# Altium PCB Vibration_Datalogger.PcbDoc (part 6 of 7)
Units mm, origin at the board's own origin, x right, y up, seen from the top; angles counter-clockwise.
Board outline 75.58 x 57.4 mm, 4 copper layers (Top Layer, Int1 (GND), Int2 (PWR), Bottom Layer), stack 1.44 mm thick; 126 components, 59 nets, 413 pads, 160 vias.
Unrouted connection lines stored in the file: 53.
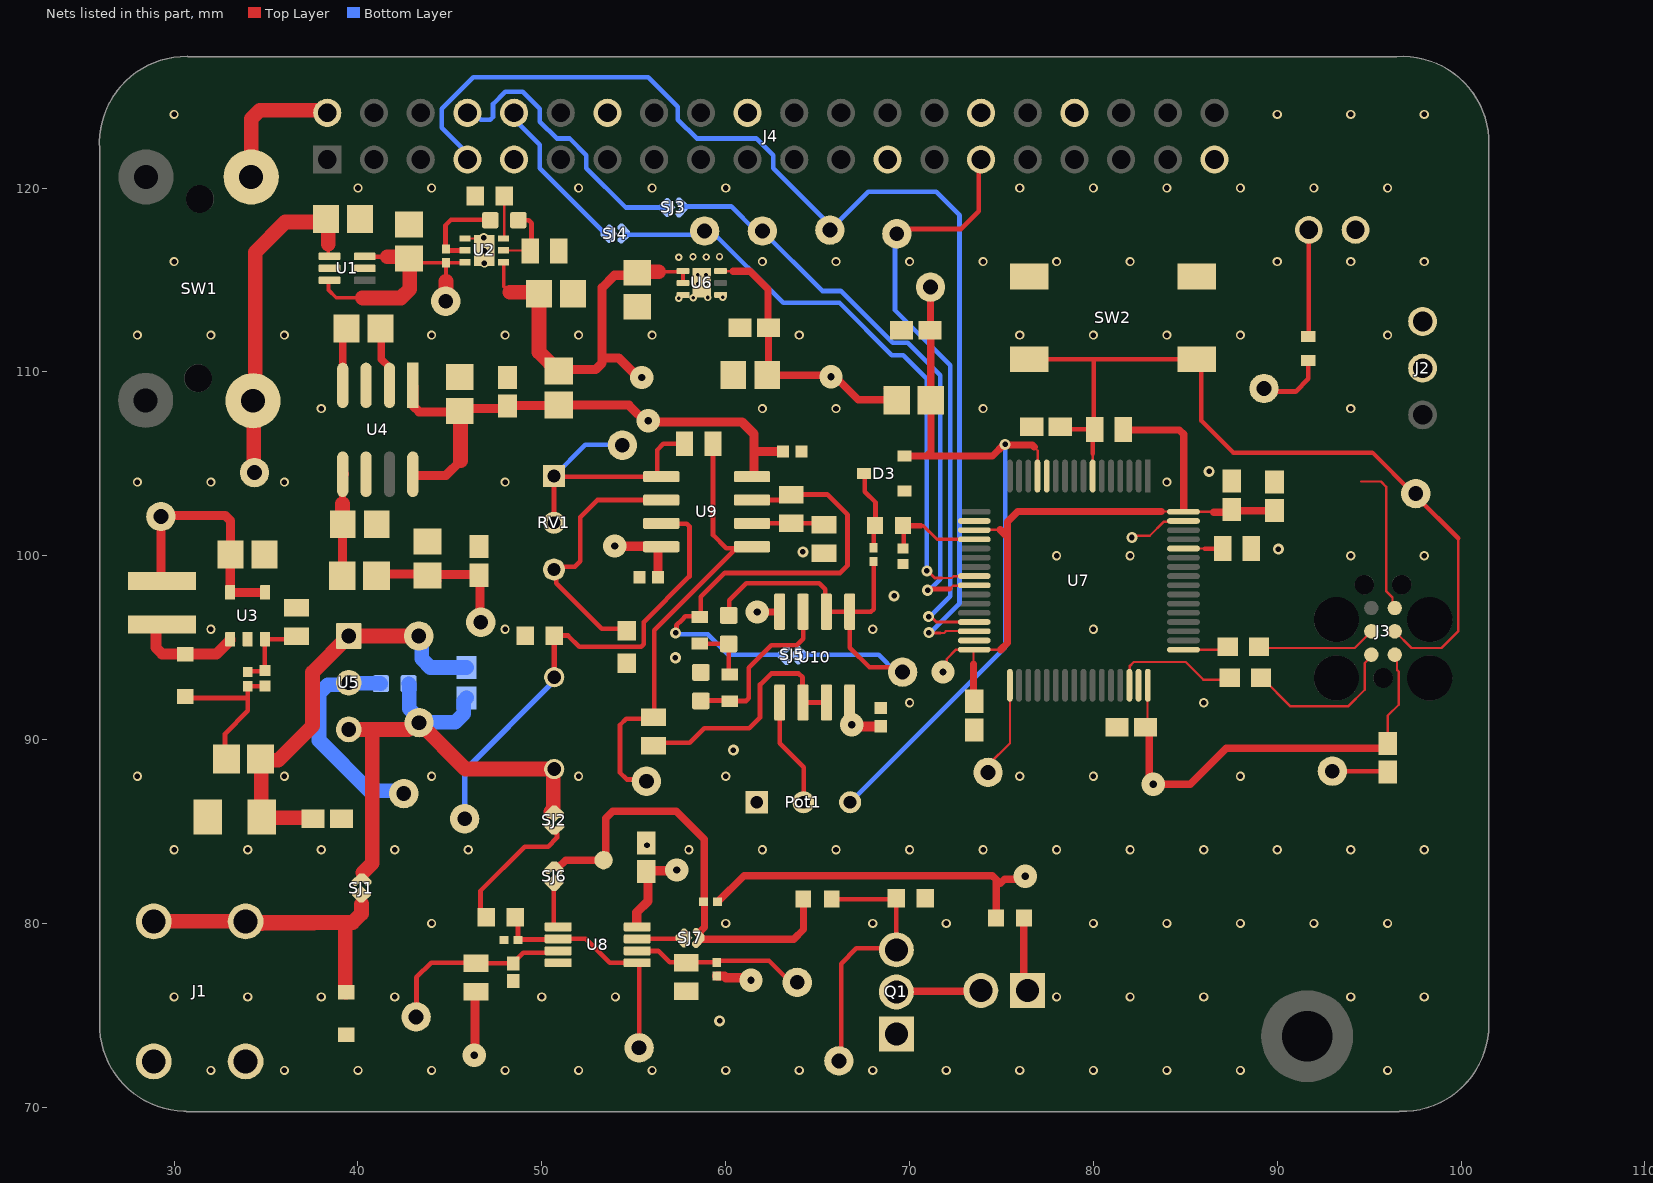
[diagram p4: the nets of this part, all layers, seen from the top]

## Part data (continued)
U4: "IC REG CHRG PUMP INV 100MA 8SOIC", Frequency=80kHz, Manufacturer="Analog Devices", Manufacturer Lifecycle Status=PRODUCTION, Max Operating Temperature=85°C, Max Power Dissipation=471mW, Max Supply Voltage=5.5V, Min Operating Temperature=-40°C, Min Supply Voltage=1.5V, Output Current=100mA, Output Voltage=-5.5V, Supplier Part Number 1=MAX660ESA+-ND, Category="Voltage Regulators - Switching", ComponentLink1Description=https://octopart.com:443/opatz8j6/c1?t=BWm-YoLOFKb6oTKA2-Oa4woj27f-4YlCw5RYG4XUvLKyF9jhqQp7CDL1R-jUfGSIj8ojPOaXqpXMzOVEXwzj2LU6GuUqVKy7rwppXb6Yhe4DcuX79IRSBrO0V0NOqZ5Kv--2xZ3GHk-ilmZIs_As33ZUjG3zZiE6Tsxk00EUgeO-VTdb5C75kIUUrUAAbuqL1eYBnEZWyx91WmaafFy1hHjUlVhFkCDvZPzEqQi0WpARzDPBuDggqnmZtUecc_6gAtnHDSZQU4AbmUeUFKfNs9EDVHME16KlOUrtC6ejHgeZa6J1DqKojKU&src-supplier=Analog+Devices, ComponentLink1URL=https://octopart.com:443/opatz8j6/c1?t=BWm-YoLOFKb6oTKA2-Oa4woj27f-4YlCw5RYG4XUvLKyF9jhqQp7CDL1R-jUfGSIj8ojPOaXqpXMzOVEXwzj2LU6GuUqVKy7rwppXb6Yhe4DcuX79IRSBrO0V0NOqZ5Kv--2xZ3GHk-ilmZIs_As33ZUjG3zZiE6Tsxk00EUgeO-VTdb5C75kIUUrUAAbuqL1eYBnEZWyx91WmaafFy1hHjUlVhFkCDvZPzEqQi0WpARzDPBuDggqnmZtUecc_6gAtnHDSZQU4AbmUeUFKfNs9EDVHME16KlOUrtC6ejHgeZa6J1DqKojKU&src-supplier=Analog+Devices, ComponentLink2Description=https://sigma.octopart.com:443/138896678/technical_drawing/Maxim-Integrated-MAX660ESA%2B.pdf?src-supplier=Upverter, ComponentLink2URL=https://sigma.octopart.com:443/138896678/technical_drawing/Maxim-Integrated-MAX660ESA%2B.pdf?src-supplier=Upverter, ComponentLink3Description=https://datasheet.octopart.com:443/MAX660ESA%2B-Analog-Devices-datasheet-88072.pdf?src-supplier=Augswan, ComponentLink3URL=https://datasheet.octopart.com:443/MAX660ESA%2B-Analog-Devices-datasheet-88072.pdf?src-supplier=Augswan, ComponentLink4Description=https://datasheet.octopart.com:443/MAX660ESA%2B-Maxim-Integrated-datasheet-14167743.pdf?src-supplier=iiiC, ComponentLink4URL=https://datasheet.octopart.com:443/MAX660ESA%2B-Maxim-Integrated-datasheet-14167743.pdf?src-supplier=iiiC, ComponentLink5Description=https://datasheet.octopart.com:443/MAX660ESA%2B-Maxim-datasheet-8202664.pdf?src-supplier=Jameco, ComponentLink5URL=https://datasheet.octopart.com:443/MAX660ESA%2B-Maxim-datasheet-8202664.pdf?src-supplier=Jameco, ComponentLink6Description=http://sigma.octopart.com:80/conflict_mineral_statement/Analog-Devices-company-33.pdf?src-supplier=Compliance+Statements, ComponentLink6URL=http://sigma.octopart.com:80/conflict_mineral_statement/Analog-Devices-company-33.pdf?src-supplier=Compliance+Statements, ComponentLink7Description=http://sigma.octopart.com:80/reach_statement/Maxim-Integrated-company-67.pdf?src-supplier=Compliance+Statements, ComponentLink7URL=http://sigma.octopart.com:80/reach_statement/Maxim-Integrated-company-67.pdf?src-supplier=Compliance+Statements, ComponentLink8Description=http://sigma.octopart.com:80/rohs_statement/Maxim-Integrated-company-66.pdf?src-supplier=Compliance+Statements, ComponentLink8URL=http://sigma.octopart.com:80/rohs_statement/Maxim-Integrated-company-66.pdf?src-supplier=Compliance+Statements, ComponentLink9Description=http://sigma.octopart.com:80/conflict_mineral_statement/Maxim-Integrated-company-65.pdf?src-supplier=Compliance+Statements, ComponentLink9URL=http://sigma.octopart.com:80/conflict_mineral_statement/Maxim-Integrated-company-65.pdf?src-supplier=Compliance+Statements, ComponentLink10Description=https://octopart.com:443/opatz8j6/c1?t=6seefSOhUnOhzho5f4xQzZxdMuzbyeX7e8GBP5GegPS5CIC4FLhGv9yyG7ITNmWqyiOeZamLNDV5KM8kLBPmWRpLipLEtqI0-UiQBhDpynsWuVJpY5DkYT-_WsnyYhRjHQRBGyfJu1WorA2bij2JhiLp4UPMZHCvQ6LWlYx2m7RLIqC0SmPcNbIfF0islbt2kir-QpHsqy3ruEwWWKir7ntLI5t72NWQmumO78YAP0BIbclvvZsZAIbyQ9oE_OmHW3VhlMLq6mYts_hLwHsHL5kN8P2U5bWrEFkUMOIg7-xCQI2zOd6uap0&src-supplier=Compliance+Statements, ComponentLink10URL=https://octopart.com:443/opatz8j6/c1?t=6seefSOhUnOhzho5f4xQzZxdMuzbyeX7e8GBP5GegPS5CIC4FLhGv9yyG7ITNmWqyiOeZamLNDV5KM8kLBPmWRpLipLEtqI0-UiQBhDpynsWuVJpY5DkYT-_WsnyYhRjHQRBGyfJu1WorA2bij2JhiLp4UPMZHCvQ6LWlYx2m7RLIqC0SmPcNbIfF0islbt2kir-QpHsqy3ruEwWWKir7ntLI5t72NWQmumO78YAP0BIbclvvZsZAIbyQ9oE_OmHW3VhlMLq6mYts_hLwHsHL5kN8P2U5bWrEFkUMOIg7-xCQI2zOd6uap0&src-supplier=Compliance+Statements, Height=1.75mm, Lead Free="Lead Free", Lifecycle Status=Production, Manufacturer Part Number=MAX660ESA+, Number of Outputs=1, Number of Pins=8, Output Type="Adjustable, Fixed", Packaging="Cut Tape", Schedule B=8542390000|8542390000|8542390000|8542390000|8542390000|8542390000|8542390000|8542390000|8542390000|8542390000|8542390000|8542390000|8542390000|8542390000|8542390000|8542390000|8542390000|8542390000|8542390000|8542390000|8542390000|8542390000|8542390000|85, Supplier 1=DigiKey, Switching Frequency=80kHz, Topology="Charge Pump"
U5: "Current Source, 3-Terminal Adjustable, True Temperature Sensor, Plastic TO-92", Case/Package=TO-92, Forward Current=10mA, Forward Voltage=30V, Manufacturer Lifecycle Status=ACTIVE, Max Input Voltage=40V, Max Operating Temperature=100°C, Min Input Voltage=1V, Min Operating Temperature=-25°C, Min Supply Voltage=800mV, Supplier Part Number 1=LM234Z-3/NOPB-ND, Tolerance=1%, Accuracy=3%, ComponentLink1Description=https://sigma.octopart.com:443/186639543/technical_drawing/Texas-Instruments-LM234Z-3-NOPB.pdf?src-supplier=Texas+Instruments, ComponentLink1URL=https://sigma.octopart.com:443/186639543/technical_drawing/Texas-Instruments-LM234Z-3-NOPB.pdf?src-supplier=Texas+Instruments, ComponentLink2Description=https://octopart.com:443/opatz8j6/c1?t=e2RhRCzYr4BaemLKaI6Kyl3dLkHRe8cPAR4nziHvLPZ6u3jocPbqPLczMX_qB1TjFc-rJuwH_w-1wo1QGmPhsZ1mqhfKdPD5jpPqpl7yftw6J2g7-DTlU3_2G7dKSwHwSh6eukuUpBIPfNV1XT-9p1oyGC5G5eJiZKdnpuoPpf5EaSVhUsFdMRU3maN4bF8ozYEKU_jysdVImzqDi1TDLCJdrref1n5n5_0vXDw3MPju_9xOun07LLv6P4X42jtso8hs6KAV3GADMlBCLxlwsMx1u6oXZTSS6Wxl3egRpprv4mlbr_xSjL6X3a2EknwEBnBODLJqNHpw2tFUkmIOCRVZvCq3Oa3d8Eedi_f1nUyBT_fc1nqfr2u4_9z82xhjLH8&src-supplier=Texas+Instruments, ComponentLink2URL=https://octopart.com:443/opatz8j6/c1?t=e2RhRCzYr4BaemLKaI6Kyl3dLkHRe8cPAR4nziHvLPZ6u3jocPbqPLczMX_qB1TjFc-rJuwH_w-1wo1QGmPhsZ1mqhfKdPD5jpPqpl7yftw6J2g7-DTlU3_2G7dKSwHwSh6eukuUpBIPfNV1XT-9p1oyGC5G5eJiZKdnpuoPpf5EaSVhUsFdMRU3maN4bF8ozYEKU_jysdVImzqDi1TDLCJdrref1n5n5_0vXDw3MPju_9xOun07LLv6P4X42jtso8hs6KAV3GADMlBCLxlwsMx1u6oXZTSS6Wxl3egRpprv4mlbr_xSjL6X3a2EknwEBnBODLJqNHpw2tFUkmIOCRVZvCq3Oa3d8Eedi_f1nUyBT_fc1nqfr2u4_9z82xhjLH8&src-supplier=Texas+Instruments, ComponentLink3Description=https://datasheet.octopart.com:443/LM234Z-3-NOPB-Texas-Instruments-datasheet-37129293.pdf?src-supplier=Texas+Instruments, ComponentLink3URL=https://datasheet.octopart.com:443/LM234Z-3-NOPB-Texas-Instruments-datasheet-37129293.pdf?src-supplier=Texas+Instruments, ComponentLink4Description=https://sigma.octopart.com:443/81678662/technical_drawing/Texas-Instruments-LM234Z-3-NOPB.pdf?src-supplier=Texas+Instruments, ComponentLink4URL=https://sigma.octopart.com:443/81678662/technical_drawing/Texas-Instruments-LM234Z-3-NOPB.pdf?src-supplier=Texas+Instruments, ComponentLink5Description=https://sigma.octopart.com:443/49250678/technical_drawing/Texas-Instruments-LM234Z-3-NOPB.pdf?src-supplier=Texas+Instruments, ComponentLink5URL=https://sigma.octopart.com:443/49250678/technical_drawing/Texas-Instruments-LM234Z-3-NOPB.pdf?src-supplier=Texas+Instruments, ComponentLink6Description=https://datasheet.octopart.com:443/LM234Z-3-NOPB-Texas-Instruments-datasheet-15827902.pdf?src-supplier=Texas+Instruments, ComponentLink6URL=https://datasheet.octopart.com:443/LM234Z-3-NOPB-Texas-Instruments-datasheet-15827902.pdf?src-supplier=Texas+Instruments, ComponentLink7Description=https://datasheet.octopart.com:443/LM234Z-3-NOPB-Texas-Instruments-datasheet-15031981.pdf?src-supplier=Texas+Instruments, ComponentLink7URL=https://datasheet.octopart.com:443/LM234Z-3-NOPB-Texas-Instruments-datasheet-15031981.pdf?src-supplier=Texas+Instruments, ComponentLink8Description=https://datasheet.octopart.com:443/LM234Z-3/NOPB-Texas-Instruments-datasheet-10669237.pdf?src-supplier=Verical, ComponentLink8URL=https://datasheet.octopart.com:443/LM234Z-3/NOPB-Texas-Instruments-datasheet-10669237.pdf?src-supplier=Verical, ComponentLink9Description=https://datasheet.octopart.com:443/LM234Z-3/NOPB-National-Semiconductor-datasheet-31214.pdf?src-supplier=Future+Electronics, ComponentLink9URL=https://datasheet.octopart.com:443/LM234Z-3/NOPB-National-Semiconductor-datasheet-31214.pdf?src-supplier=Future+Electronics, ComponentLink10Description=https://datasheet.octopart.com:443/LM234Z-3-NOPB-Texas-Instruments-datasheet-65712963.pdf?src-supplier=Newark, ComponentLink10URL=https://datasheet.octopart.com:443/LM234Z-3-NOPB-Texas-Instruments-datasheet-65712963.pdf?src-supplier=Newark, ComponentLink11Description=https://datasheet.octopart.com:443/LM234Z-3-NOPB-Texas-Instruments-datasheet-32045309.pdf?src-supplier=Newark, ComponentLink11URL=https://datasheet.octopart.com:443/LM234Z-3-NOPB-Texas-Instruments-datasheet-32045309.pdf?src-supplier=Newark, ComponentLink12Description=https://datasheet.octopart.com:443/LM234Z-3-NOPB-Texas-Instruments-datasheet-27908155.pdf?src-supplier=Farnell, ComponentLink12URL=https://datasheet.octopart.com:443/LM234Z-3-NOPB-Texas-Instruments-datasheet-27908155.pdf?src-supplier=Farnell, ComponentLink13Description=https://datasheet.octopart.com:443/LM234Z-3-NOPB-Texas-Instruments-datasheet-26823820.pdf?src-supplier=Farnell, ComponentLink13URL=https://datasheet.octopart.com:443/LM234Z-3-NOPB-Texas-Instruments-datasheet-26823820.pdf?src-supplier=Farnell, ComponentLink14Description=https://datasheet.octopart.com:443/LM234Z-3-NOPB-Texas-Instruments-datasheet-20860903.pdf?src-supplier=element14+APAC, ComponentLink14URL=https://datasheet.octopart.com:443/LM234Z-3-NOPB-Texas-Instruments-datasheet-20860903.pdf?src-supplier=element14+APAC, ComponentLink15Description=https://datasheet.octopart.com:443/LM234Z-3-NOPB-Texas-Instruments-datasheet-159115105.pdf?src-supplier=SHENGYU+ELECTRONICS, ComponentLink15URL=https://datasheet.octopart.com:443/LM234Z-3-NOPB-Texas-Instruments-datasheet-159115105.pdf?src-supplier=SHENGYU+ELECTRONICS, ComponentLink16Description=https://datasheet.octopart.com:443/LM234Z-3-NOPB-Texas-Instruments-datasheet-83038145.pdf?src-supplier=TME, ComponentLink16URL=https://datasheet.octopart.com:443/LM234Z-3-NOPB-Texas-Instruments-datasheet-83038145.pdf?src-supplier=TME, ComponentLink17Description=https://datasheet.octopart.com:443/LM234Z-3-NOPB-Texas-Instruments-datasheet-16809449.pdf?src-supplier=TME, ComponentLink17URL=https://datasheet.octopart.com:443/LM234Z-3-NOPB-Texas-Instruments-datasheet-16809449.pdf?src-supplier=TME, ComponentLink18Description=https://datasheet.octopart.com:443/LM234Z-3/NOPB-National-Semiconductor-datasheet-9767840.pdf?src-supplier=RS+(Formerly+Allied+Electronics), ComponentLink18URL=https://datasheet.octopart.com:443/LM234Z-3/NOPB-National-Semiconductor-datasheet-9767840.pdf?src-supplier=RS+(Formerly+Allied+Electronics), ComponentLink19Description=https://datasheet.octopart.com:443/LM234Z-3-NOPB-Texas-Instruments-datasheet-8200682.pdf?src-supplier=Jameco, ComponentLink19URL=https://datasheet.octopart.com:443/LM234Z-3-NOPB-Texas-Instruments-datasheet-8200682.pdf?src-supplier=Jameco, ComponentLink20Description=http://sigma.octopart.com:80/reach_statement/Texas-Instruments-company-64.pdf?src-supplier=Compliance+Statements, ComponentLink20URL=http://sigma.octopart.com:80/reach_statement/Texas-Instruments-company-64.pdf?src-supplier=Compliance+Statements, ComponentLink21Description=http://sigma.octopart.com:80/conflict_mineral_statement/Texas-Instruments-company-63.pdf?src-supplier=Compliance+Statements, ComponentLink21URL=http://sigma.octopart.com:80/conflict_mineral_statement/Texas-Instruments-company-63.pdf?src-supplier=Compliance+Statements, Contact Plating=Tin, Element Configuration=Single, Height=5.34mm, Length=4.3mm, Lifecycle Status=Production, Max Supply Voltage=40V, Mount="Through Hole", Number of Outputs=1, Number of Pins=3, Output Current=10mA, Output Type=ANALOG, Packaging=Bulk, Radiation Hardening=No, REACH SVHC=No, Reference Type=Adjustable, Schedule B="8542390000, 8542390000|8542390000|8542390000|8542390000|8542390000", Supplier 1=DigiKey, Thickness=3.6mm, Weight=113.398093g, Width=4.3mm
U6: "Automotive 300-mA, off-battery (40-V)", Manufacturer Lifecycle Status=ACTIVE, ComponentLink1Description=https://octopart.com:443/opatz8j6/c1?t=7WSiqJunUI9PIgH4jquUaBZ0plxXeUuqYMIPiF3Fcq2ByK__oXuosoh3mTagRzsU4agXS4_UEROCi43alXdyG2a5hYo9-HG_-7X6kM4r6qj9wp7KdzS2C1Vmd9Ir5QWmeBQS-5NT3OlSg48qqFkngutyYdPK2ycNM9N52tSI-HUKm2h_zSeQewzbAIKyX1a4E_EF_w0K0VgOFf-574NeTyVLxAkzIKiRGI-2MsPoZkbg6c0ISr3inrqLNKDuytzNxSijH2pgjYuFKlNzqyrZ4zZhF9z6BiGuo0zDncjw1a8TyHWSFf_A30hHC09PYNw30vrLfKP2-2k4ZPSiKQLAJsQn9K0t10BVvaBPy7E6j06zM4Lupep1NpchOOxXVFjw1iOiQ3VzQ5l2&src-supplier=Texas+Instruments, ComponentLink1URL=https://octopart.com:443/opatz8j6/c1?t=7WSiqJunUI9PIgH4jquUaBZ0plxXeUuqYMIPiF3Fcq2ByK__oXuosoh3mTagRzsU4agXS4_UEROCi43alXdyG2a5hYo9-HG_-7X6kM4r6qj9wp7KdzS2C1Vmd9Ir5QWmeBQS-5NT3OlSg48qqFkngutyYdPK2ycNM9N52tSI-HUKm2h_zSeQewzbAIKyX1a4E_EF_w0K0VgOFf-574NeTyVLxAkzIKiRGI-2MsPoZkbg6c0ISr3inrqLNKDuytzNxSijH2pgjYuFKlNzqyrZ4zZhF9z6BiGuo0zDncjw1a8TyHWSFf_A30hHC09PYNw30vrLfKP2-2k4ZPSiKQLAJsQn9K0t10BVvaBPy7E6j06zM4Lupep1NpchOOxXVFjw1iOiQ3VzQ5l2&src-supplier=Texas+Instruments, ComponentLink2Description=http://sigma.octopart.com:80/reach_statement/Texas-Instruments-company-64.pdf?src-supplier=Compliance+Statements, ComponentLink2URL=http://sigma.octopart.com:80/reach_statement/Texas-Instruments-company-64.pdf?src-supplier=Compliance+Statements, ComponentLink3Description=http://sigma.octopart.com:80/conflict_mineral_statement/Texas-Instruments-company-63.pdf?src-supplier=Compliance+Statements, ComponentLink3URL=http://sigma.octopart.com:80/conflict_mineral_statement/Texas-Instruments-company-63.pdf?src-supplier=Compliance+Statements, Height=800µm, Length=2mm, Lifecycle Status=Production, Number of Pins=6, Thickness=750µm, Width=2mm
U7: "IC MCU 32BIT 512KB FLASH 64LQFP", Ambient Temperature Range High=85°C, Case/Package=LFQFP, Frequency=72MHz, Manufacturer=STMicroelectronics, Max Frequency=32MHz, Max Junction Temperature (Tj)=105°C, Max Supply Current=76.9mA, Max Supply Voltage=3.6V, Min Operating Temperature=-40°C, Min Supply Voltage=2V, Nominal Supply Current=2µA, Nominal Supply Voltage (DC)=3.3V, Supplier Part Number 1=497-15163-ND, Temperature Grade=Industrial, ADC Channels (Resolution)="22-Ch 12-Bit", Category=Microcontrollers, China RoHS=Compliant, ComponentLink1Description=https://datasheet.octopart.com:443/STM32F303RET6-STMicroelectronics-datasheet-68303033.pdf?src-supplier=IHS, ComponentLink1URL=https://datasheet.octopart.com:443/STM32F303RET6-STMicroelectronics-datasheet-68303033.pdf?src-supplier=IHS, ComponentLink2Description=https://datasheet.octopart.com:443/STM32F303RET6-STMicroelectronics-datasheet-61689937.pdf?src-supplier=STMicroelectronics, ComponentLink2URL=https://datasheet.octopart.com:443/STM32F303RET6-STMicroelectronics-datasheet-61689937.pdf?src-supplier=STMicroelectronics, ComponentLink3Description=https://datasheet.octopart.com:443/STM32F303RET6-STMicroelectronics-datasheet-37090231.pdf?src-supplier=STMicroelectronics, ComponentLink3URL=https://datasheet.octopart.com:443/STM32F303RET6-STMicroelectronics-datasheet-37090231.pdf?src-supplier=STMicroelectronics, ComponentLink4Description=https://datasheet.octopart.com:443/STM32F303RET6-STMicroelectronics-datasheet-43912984.pdf?src-supplier=element14+APAC, ComponentLink4URL=https://datasheet.octopart.com:443/STM32F303RET6-STMicroelectronics-datasheet-43912984.pdf?src-supplier=element14+APAC, ComponentLink5Description=https://datasheet.octopart.com:443/STM32F303RET6-STMicroelectronics-datasheet-37697013.pdf?src-supplier=Newark, ComponentLink5URL=https://datasheet.octopart.com:443/STM32F303RET6-STMicroelectronics-datasheet-37697013.pdf?src-supplier=Newark, ComponentLink6Description=https://datasheet.octopart.com:443/STM32F303RET6-STMicroelectronics-datasheet-37143350.pdf?src-supplier=Farnell, ComponentLink6URL=https://datasheet.octopart.com:443/STM32F303RET6-STMicroelectronics-datasheet-37143350.pdf?src-supplier=Farnell, ComponentLink7Description=https://datasheet.octopart.com:443/STM32F303RET6-STMicroelectronics-datasheet-136987017.pdf?src-supplier=TME, ComponentLink7URL=https://datasheet.octopart.com:443/STM32F303RET6-STMicroelectronics-datasheet-136987017.pdf?src-supplier=TME, Core Architecture="ARM Cortex-M4", Country of Origin="Mainland China", DAC Channels (Resolution)="2-Ch 12-Bit", Data Bus Width=32b, EEPROM Memory Size=0B, Export Control Classification Number (ECCN) Code=3A991.A.2, Flash Memory Size=512kB, Harmonized Tariff Schedule (HTS) Code=8542.31.00.25, Height=1.6mm, Height - Seated (Max)=1.6mm, Interface="CAN, IrDA, LIN, SMBus, USB", Introduction Date=2015-03-03, Lead Free="Lead Free", Length=10mm, Lifecycle Status=Production, Manufacturer Part Number=STM32F303RET6, Max Operating Temperature=85°C, Memory Size=512kB, Memory Type=FLASH, Mount="Surface Mount", Number of A/D Converters=4, Number of ADC Channels=22, Number of Channels=22, Number of D/A Converters=2, Number of I2C Channels=3, Number of I/Os=51, Number of Pins=64, Number of PWM Channels=31, Number of SPI Channels=3, Number of Terminals=64, Number of Timers/Counters=1, Number of UART Channels=2, Number of USART Channels=3, Number of USB Channels=1, Operating Supply Voltage=3.3V, Oscillator Type=Internal, Peripherals=POR, RAM Size=64kB, REACH SVHC=Yes, Schedule B=8542310000, Supplier 1=DigiKey, Terminal Pitch=500µm, Weight=342.689036mg, Width=10mm
U8: "Dual high voltage, low power comparator 8-VSSOP -40 to 125", Case/Package=VSSOP, Input Bias Current=5nA, Input Offset Voltage (Vos)=500µV, Manufacturer="Texas Instruments", Manufacturer Lifecycle Status=ACTIVE, Max Dual Supply Voltage=18V, Max Input Current=15nA, Max Junction Temperature (Tj)=150°C, Max Operating Temperature=125°C, Max Supply Voltage=36V, Min Dual Supply Voltage=1.1V, Min Operating Temperature=-40°C, Min Supply Voltage=2.2V, Nominal Supply Current=55µA, Output Current=20mA, Power Supply Rejection Ratio (PSRR)=-96.48dB, Quiescent Current=75µA, Supplier Part Number 1=296-37236-1-ND, Category="Amplifiers - Op Amps, Buffer, Instrumentation", ComponentLink1Description=https://sigma.octopart.com:443/178522223/technical_drawing/Texas-Instruments-TLV1702AIDGKR.pdf?src-supplier=Texas+Instruments, ComponentLink1URL=https://sigma.octopart.com:443/178522223/technical_drawing/Texas-Instruments-TLV1702AIDGKR.pdf?src-supplier=Texas+Instruments, ComponentLink2Description=https://octopart.com:443/opatz8j6/c1?t=iUaDZ-roroNCIkqhQWv481ZQhiF8nH3-hn0LhaP1ZkZhWb0ADq8d21KKoeXJAMhbDkTgPtXMcxPelJe7xmMcY3d8WOArPCvBD_CUDe98PeZzwIcJTAEO9QVrhY-wSCJLAyyKxEq_36_Jt6W9QKfV9tz-7JohwOIdPAcSF3qzmsqi29B08OhjiuU5AfCzN1A5u4SaLfV4xJOvorKTzgC3yuPazlCMruIP3GdvfBkPZKAH6DndcCKd1cwEkO599W7mIbsDlu8FlknlULDCKD5i6KonTEJfSLepJHYEgx4vVHjyxHkPkY-yJx7bnKvsyxO69ltH3DeBKHoo2qdhi6O-3z2GBnwoXNw5nBGCkfBeUnjnVFnxqD0vAPUpFnV2UOdJtoDqpNs&src-supplier=Texas+Instruments, ComponentLink2URL=https://octopart.com:443/opatz8j6/c1?t=iUaDZ-roroNCIkqhQWv481ZQhiF8nH3-hn0LhaP1ZkZhWb0ADq8d21KKoeXJAMhbDkTgPtXMcxPelJe7xmMcY3d8WOArPCvBD_CUDe98PeZzwIcJTAEO9QVrhY-wSCJLAyyKxEq_36_Jt6W9QKfV9tz-7JohwOIdPAcSF3qzmsqi29B08OhjiuU5AfCzN1A5u4SaLfV4xJOvorKTzgC3yuPazlCMruIP3GdvfBkPZKAH6DndcCKd1cwEkO599W7mIbsDlu8FlknlULDCKD5i6KonTEJfSLepJHYEgx4vVHjyxHkPkY-yJx7bnKvsyxO69ltH3DeBKHoo2qdhi6O-3z2GBnwoXNw5nBGCkfBeUnjnVFnxqD0vAPUpFnV2UOdJtoDqpNs&src-supplier=Texas+Instruments, ComponentLink3Description=https://datasheet.octopart.com:443/TLV1702AIDGKR-Texas-Instruments-datasheet-41217926.pdf?src-supplier=Texas+Instruments, ComponentLink3URL=https://datasheet.octopart.com:443/TLV1702AIDGKR-Texas-Instruments-datasheet-41217926.pdf?src-supplier=Texas+Instruments, ComponentLink4Description=https://datasheet.octopart.com:443/TLV1702AIDGKR-Texas-Instruments-datasheet-34154349.pdf?src-supplier=Texas+Instruments, ComponentLink4URL=https://datasheet.octopart.com:443/TLV1702AIDGKR-Texas-Instruments-datasheet-34154349.pdf?src-supplier=Texas+Instruments, ComponentLink5Description=https://datasheet.octopart.com:443/TLV1702AIDGKR-Texas-Instruments-datasheet-32736893.pdf?src-supplier=Texas+Instruments, ComponentLink5URL=https://datasheet.octopart.com:443/TLV1702AIDGKR-Texas-Instruments-datasheet-32736893.pdf?src-supplier=Texas+Instruments, ComponentLink6Description=https://datasheet.octopart.com:443/TLV1702AIDGKR-Texas-Instruments-datasheet-32015743.pdf?src-supplier=Texas+Instruments, ComponentLink6URL=https://datasheet.octopart.com:443/TLV1702AIDGKR-Texas-Instruments-datasheet-32015743.pdf?src-supplier=Texas+Instruments, ComponentLink7Description=https://datasheet.octopart.com:443/TLV1702AIDGKR-Texas-Instruments-datasheet-21256581.pdf?src-supplier=Texas+Instruments, ComponentLink7URL=https://datasheet.octopart.com:443/TLV1702AIDGKR-Texas-Instruments-datasheet-21256581.pdf?src-supplier=Texas+Instruments, ComponentLink8Description=https://sigma.octopart.com:443/49250154/technical_drawing/Texas-Instruments-TLV1702AIDGKR.pdf?src-supplier=Texas+Instruments, ComponentLink8URL=https://sigma.octopart.com:443/49250154/technical_drawing/Texas-Instruments-TLV1702AIDGKR.pdf?src-supplier=Texas+Instruments, ComponentLink9Description=https://datasheet.octopart.com:443/TLV1702AIDGKR-Texas-Instruments-datasheet-147835657.pdf?src-supplier=Upverter, ComponentLink9URL=https://datasheet.octopart.com:443/TLV1702AIDGKR-Texas-Instruments-datasheet-147835657.pdf?src-supplier=Upverter, ComponentLink10Description=https://datasheet.octopart.com:443/TLV1702AIDGKR-Texas-Instruments-datasheet-66581735.pdf?src-supplier=Newark, ComponentLink10URL=https://datasheet.octopart.com:443/TLV1702AIDGKR-Texas-Instruments-datasheet-66581735.pdf?src-supplier=Newark, ComponentLink11Description=https://datasheet.octopart.com:443/TLV1702AIDGKR-Texas-Instruments-datasheet-33012491.pdf?src-supplier=Newark, ComponentLink11URL=https://datasheet.octopart.com:443/TLV1702AIDGKR-Texas-Instruments-datasheet-33012491.pdf?src-supplier=Newark, ComponentLink12Description=https://datasheet.octopart.com:443/TLV1702AIDGKR-Texas-Instruments-datasheet-49588982.pdf?src-supplier=element14+APAC, ComponentLink12URL=https://datasheet.octopart.com:443/TLV1702AIDGKR-Texas-Instruments-datasheet-49588982.pdf?src-supplier=element14+APAC, ComponentLink13Description=https://datasheet.octopart.com:443/TLV1702AIDGKR-Texas-Instruments-datasheet-37140355.pdf?src-supplier=element14+APAC, ComponentLink13URL=https://datasheet.octopart.com:443/TLV1702AIDGKR-Texas-Instruments-datasheet-37140355.pdf?src-supplier=element14+APAC, ComponentLink14Description=https://datasheet.octopart.com:443/TLV1702AIDGKR-Texas-Instruments-datasheet-140571703.pdf?src-supplier=Arrow.cn, ComponentLink14URL=https://datasheet.octopart.com:443/TLV1702AIDGKR-Texas-Instruments-datasheet-140571703.pdf?src-supplier=Arrow.cn, ComponentLink15Description=https://datasheet.octopart.com:443/TLV1702AIDGKR-Texas-Instruments-datasheet-83188854.pdf?src-supplier=TME, ComponentLink15URL=https://datasheet.octopart.com:443/TLV1702AIDGKR-Texas-Instruments-datasheet-83188854.pdf?src-supplier=TME, ComponentLink16Description=http://sigma.octopart.com:80/reach_statement/Texas-Instruments-company-64.pdf?src-supplier=Compliance+Statements, ComponentLink16URL=http://sigma.octopart.com:80/reach_statement/Texas-Instruments-company-64.pdf?src-supplier=Compliance+Statements, ComponentLink17Description=http://sigma.octopart.com:80/conflict_mineral_statement/Texas-Instruments-company-63.pdf?src-supplier=Compliance+Statements, ComponentLink17URL=http://sigma.octopart.com:80/conflict_mineral_statement/Texas-Instruments-company-63.pdf?src-supplier=Compliance+Statements, Contact Plating="Gold, Silver", Height=0m, Lead Free="Lead Free", Length=3mm, Lifecycle Status=Production, Manufacturer Part Number=TLV1702AIDGKR, Mount="Surface Mount", Number of Channels=2, Number of Elements=2, Number of Pins=8, Propagation Delay=560ns, REACH SVHC=No, Response Time=780ns, Schedule B="8542390000, 8542390000|8542390000|8542390000|8542390000|8542390000|8542390000|8542390000|8542390000|8542390000|8542390000|8542390000|8542390000|8542390000|8542390000|8542390000|8542390000|8542390000|8542390000|8542390000|8542390000|8542390000|8542390000|8542390000|85", Supplier 1=DigiKey, Thickness=970µm, Type="General Purpose", Width=3mm
U9 U10: "IC OPAMP GP 2 CIRCUIT 8SOIC", Case/Package=SO, Input Bias Current=200pA, Input Offset Voltage (Vos)=13mV, Manufacturer=STMicroelectronics, Manufacturer Lifecycle Status=ACTIVE, Manufacturer Part Number=TL082IDT, Max Dual Supply Voltage=18V, Max Operating Temperature=105°C, Max Power Dissipation=680mW, Max Supply Current=2.5mA, Min Dual Supply Voltage=3V, Min Operating Temperature=-40°C, Min Supply Voltage=6V, Nominal Supply Current=1.4mA, Operating Supply Voltage=15V, Output Current=40mA, Supplier Part Number 1=296-42106-6-ND, Temperature Grade=Industrial, Voltage Gain=106.02dB, Bandwidth=4MHz, Category="Amplifiers - Op Amps, Buffer, Instrumentation", China RoHS=Compliant, Common Mode Rejection Ratio=80dB, ComponentLink1Description=https://datasheet.octopart.com:443/TL082IDT-STMicroelectronics-datasheet-68295580.pdf?src-supplier=Newark, ComponentLink1URL=https://datasheet.octopart.com:443/TL082IDT-STMicroelectronics-datasheet-68295580.pdf?src-supplier=Newark, ComponentLink2Description=https://datasheet.octopart.com:443/TL082IDT-STMicroelectronics-datasheet-10692279.pdf?src-supplier=Newark, ComponentLink2URL=https://datasheet.octopart.com:443/TL082IDT-STMicroelectronics-datasheet-10692279.pdf?src-supplier=Newark, ComponentLink3Description=https://datasheet.octopart.com:443/TL082IDT-STMicroelectronics-datasheet-37002800.pdf?src-supplier=element14+APAC, ComponentLink3URL=https://datasheet.octopart.com:443/TL082IDT-STMicroelectronics-datasheet-37002800.pdf?src-supplier=element14+APAC, ComponentLink4Description=https://datasheet.octopart.com:443/TL082IDT-STMicroelectronics-datasheet-5315494.pdf?src-supplier=STMicroelectronics, ComponentLink4URL=https://datasheet.octopart.com:443/TL082IDT-STMicroelectronics-datasheet-5315494.pdf?src-supplier=STMicroelectronics, ComponentLink5Description=https://datasheet.octopart.com:443/TL082IDT-STMicroelectronics-datasheet-20031.pdf?src-supplier=Sierra+IC, ComponentLink5URL=https://datasheet.octopart.com:443/TL082IDT-STMicroelectronics-datasheet-20031.pdf?src-supplier=Sierra+IC, ComponentLink6Description=https://datasheet.octopart.com:443/TL082IDT-STMicroelectronics-datasheet-14138407.pdf?src-supplier=iiiC, ComponentLink6URL=https://datasheet.octopart.com:443/TL082IDT-STMicroelectronics-datasheet-14138407.pdf?src-supplier=iiiC, ComponentLink7Description=https://datasheet.octopart.com:443/OPA2192IDR-Texas-Instruments-datasheet-41216690.pdf?src-supplier=Texas+Instruments, ComponentLink7URL=https://datasheet.octopart.com:443/OPA2192IDR-Texas-Instruments-datasheet-41216690.pdf?src-supplier=Texas+Instruments, ComponentLink8Description=https://octopart.com:443/opatz8j6/c1?t=2jMPwhJaFj21i54Nabx5wcBwzc_v34gRnVrgDQ7eoTPi6NA-KLSm2uSIBq4XMvkakJrwpjUok_iH5xNbqqgCjQHATgNagnWJ1GBKhYwvDjzxIebgjcBKya2R1xlzTxGnyXFKqQU3SisWdQfHaW__C_MbdE4_ZQ7vmsF44oQ_12mJHVIUpozdPche9huG8eP8gFv-vuS7pdJ7u4vGdUzf5gxgYo936ChnChzKCxlAOP2qNn2hOVAUdpol2nRIQsLgsA4TAAZho4OqyIkKr-xneLZ_sFFifMNCA69dyKZbDpzOhpbS9-Z9Rqoxad8quOtMa2QkPYzIb9-UhzkV0iAVoOIs8qtH9HHyo4x-P8sbbqVwKESVmCagTjFNAgp_124KubOeTSI&src-supplier=Texas+Instruments, ComponentLink8URL=https://octopart.com:443/opatz8j6/c1?t=2jMPwhJaFj21i54Nabx5wcBwzc_v34gRnVrgDQ7eoTPi6NA-KLSm2uSIBq4XMvkakJrwpjUok_iH5xNbqqgCjQHATgNagnWJ1GBKhYwvDjzxIebgjcBKya2R1xlzTxGnyXFKqQU3SisWdQfHaW__C_MbdE4_ZQ7vmsF44oQ_12mJHVIUpozdPche9huG8eP8gFv-vuS7pdJ7u4vGdUzf5gxgYo936ChnChzKCxlAOP2qNn2hOVAUdpol2nRIQsLgsA4TAAZho4OqyIkKr-xneLZ_sFFifMNCA69dyKZbDpzOhpbS9-Z9Rqoxad8quOtMa2QkPYzIb9-UhzkV0iAVoOIs8qtH9HHyo4x-P8sbbqVwKESVmCagTjFNAgp_124KubOeTSI&src-supplier=Texas+Instruments, ComponentLink9Description=https://datasheet.octopart.com:443/OPA2192IDR-Texas-Instruments-datasheet-38965043.pdf?src-supplier=Texas+Instruments, ComponentLink9URL=https://datasheet.octopart.com:443/OPA2192IDR-Texas-Instruments-datasheet-38965043.pdf?src-supplier=Texas+Instruments, ComponentLink10Description=https://datasheet.octopart.com:443/OPA2192IDR-Texas-Instruments-datasheet-38229673.pdf?src-supplier=Texas+Instruments, ComponentLink10URL=https://datasheet.octopart.com:443/OPA2192IDR-Texas-Instruments-datasheet-38229673.pdf?src-supplier=Texas+Instruments, ComponentLink11Description=https://datasheet.octopart.com:443/OPA2192IDR-Texas-Instruments-datasheet-21773461.pdf?src-supplier=Texas+Instruments, ComponentLink11URL=https://datasheet.octopart.com:443/OPA2192IDR-Texas-Instruments-datasheet-21773461.pdf?src-supplier=Texas+Instruments, ComponentLink12Description=https://sigma.octopart.com:443/49249642/technical_drawing/Texas-Instruments-OPA2192IDR.pdf?src-supplier=Texas+Instruments, ComponentLink12URL=https://sigma.octopart.com:443/49249642/technical_drawing/Texas-Instruments-OPA2192IDR.pdf?src-supplier=Texas+Instruments, ComponentLink13Description=https://datasheet.octopart.com:443/OPA2192IDR-Texas-Instruments-datasheet-61016689.pdf?src-supplier=element14+APAC, ComponentLink13URL=https://datasheet.octopart.com:443/OPA2192IDR-Texas-Instruments-datasheet-61016689.pdf?src-supplier=element14+APAC, ComponentLink14Description=https://datasheet.octopart.com:443/OPA2192IDR-Texas-Instruments-datasheet-43921497.pdf?src-supplier=element14+APAC, ComponentLink14URL=https://datasheet.octopart.com:443/OPA2192IDR-Texas-Instruments-datasheet-43921497.pdf?src-supplier=element14+APAC, ComponentLink15Description=https://datasheet.octopart.com:443/OPA2192IDR-Texas-Instruments-datasheet-48370340.pdf?src-supplier=element14+APAC, ComponentLink15URL=https://datasheet.octopart.com:443/OPA2192IDR-Texas-Instruments-datasheet-48370340.pdf?src-supplier=element14+APAC, ComponentLink16Description=https://datasheet.octopart.com:443/OPA2192IDR-Texas-Instruments-datasheet-165810930.pdf?src-supplier=LCSC, ComponentLink16URL=https://datasheet.octopart.com:443/OPA2192IDR-Texas-Instruments-datasheet-165810930.pdf?src-supplier=LCSC, ComponentLink17Description=https://datasheet.octopart.com:443/OPA2192IDR-Texas-Instruments-datasheet-159115559.pdf?src-supplier=LCSC, ComponentLink17URL=https://datasheet.octopart.com:443/OPA2192IDR-Texas-Instruments-datasheet-159115559.pdf?src-supplier=LCSC, ComponentLink18Description=http://sigma.octopart.com:80/reach_statement/Texas-Instruments-company-64.pdf?src-supplier=Compliance+Statements, ComponentLink18URL=http://sigma.octopart.com:80/reach_statement/Texas-Instruments-company-64.pdf?src-supplier=Compliance+Statements, ComponentLink19Description=http://sigma.octopart.com:80/conflict_mineral_statement/Texas-Instruments-company-63.pdf?src-supplier=Compliance+Statements, ComponentLink19URL=http://sigma.octopart.com:80/conflict_mineral_statement/Texas-Instruments-company-63.pdf?src-supplier=Compliance+Statements, Contact Plating=Tin, Country of Origin="Mainland China, Morocco", Export Control Classification Number (ECCN) Code=EAR99, Gain Bandwidth Product=4MHz, Harmonized Tariff Schedule (HTS) Code=8542.33.00.01, Height=1.25mm, Height - Seated (Max)=1.75mm, Introduction Date=1980-01-04, Lead Free="Lead Free", Length=4.9mm, Lifecycle Status=Production, Max Supply Voltage=18V, Mount="Surface Mount", Number of Amplifiers=2, Number of Channels=2, Number of Circuits=2, Number of Elements=2, Number of Pins=8, Number of Terminals=2, Operating Supply Current=1.4mA, Output Current per Channel=40mA, Packaging="Tape and Reel", Power Dissipation=680mW, Radiation Hardening=No, REACH SVHC=Yes, Schedule B="8542330000, 8542330000|8542330000|8542330000|8542330000|8542330000|8542330000|8542330000|8542330000|8542330000|8542330000|8542330000|8542330000|8542330000|8542330000|8542330000|8542330000|8542330000|8542330000|8542330000|8542330000|8542330000|8542330000|8542330000|85", Slew Rate=8V/µs, Supplier 1=DigiKey, Terminal Pitch=1.27mm, Thickness=1.58mm, Unity Gain Bandwidth Product=4MHz, Width=3.9mm

## Via types
v1: diameter 0.5, hole 0.3, Top Layer to Bottom Layer, tented both sides, 118 vias
v2: diameter 0.6, hole 0.3, Top Layer to Bottom Layer, tented both sides, 14 vias
v3: diameter 1.27, hole 0.4, Top Layer to Int2 (PWR), tented both sides, 11 vias
v4: diameter 0.4, hole 0.2, Top Layer to Bottom Layer, tented both sides, 8 vias
v5: diameter 0.4, hole 0.2, Top Layer to Bottom Layer, 4 vias
v6: diameter 0.5, hole 0.3, Top Layer to Bottom Layer, 3 vias
v7: diameter 0.7, hole 0.3, Top Layer to Bottom Layer, 1 vias
v8: diameter 1.27, hole 0.4, Top Layer to Int2 (PWR), 1 vias

## Nets (pads, with @x,y where several pads share a name; then routed paths per layer and width w, separated by ;. In a path a pad name is that pad's centre, name@x,y a point inside that pad or via, vN(x,y) a via of type N, cw(c..) or ccw(c..) an arc to the next point about the centre after c; other vN are vias at no path point)
5V_ANA: C4.1 C5.1 C25.1 C28.1 C31.2 FB1.2 R22.2 R24.1 U4.1 U4.8 U8.8 U9.8 U10.8 | length 44.9
  Top Layer w0.5: U4.8@42.98,104.43 42.98,104.409 43.029,104.36 44.78,104.36 45.58,105.16 ; U4.1@42.98,109.262 43.033,109.209 43.033,108.113 43.326,107.82 45.48,107.82 C4.1@45.53,107.87 45.663,108.003 47.997,108.003 C5.1@48.13,108.136 48.157,108.163 50.903,108.163 FB1.2@50.93,108.19 51.217,108.19 54.735,108.19 55.785,107.14 v3@55.92,107.14 ; v3(46.33,72.83) 46.372,72.872 46.372,76.237 R24.1@46.414,76.279 R24.1@46.484,76.209 ; FB1.2@50.93,108.423 51.217,108.423 FB1.2@51.23,108.41 ; 55.16,80.05 55.16,80.6 55.78,81.22 55.78,82.441 C25.1@55.67,82.82 55.71,82.86 57.291,82.86 v3(57.331,82.9) ; v3@56.22,107.36 56.311,107.269 60.891,107.269 61.54,106.62 61.54,105.66 ; R22.2@59.51,77.13 59.942,77.13 60.024,77.047 61.233,77.047 v3(61.38,76.9) ; U9.8@61.436,104.297 61.49,104.297 61.54,104.347 61.54,105.66 ; C28.1@63.13,105.73 63.06,105.66 61.54,105.66 ; U10.8@66.747,92.014 66.797,91.964 66.797,90.97 67.09,90.677 C31.2@68.32,90.677 ; v3(66.86,90.81) 66.927,90.743 C31.2@68.3,90.743
  Top Layer w0.8: C4.1@45.53,107.87 45.53,107.617 45.58,107.567 45.58,105.16
  other v3: 55.79,107.34
24V: +24.1 C8.1 C9.1 FB2.2 R7.2 U5.1 | length 23.1
  Top Layer w0.8: FB2.2@34.7,88.94 FB2.2@34.736,88.904 ; C9.1@37.55,85.69 37.5,85.74 34.822,85.74 C8.1@34.772,85.79 34.736,85.826 FB2.2@34.736,88.904 ; +24.1@43.307,95.631 U5.1@39.497,95.631 37.53,93.664 37.53,90.749 35.66,88.879 34.761,88.879 FB2.2@34.736,88.904
  Bottom Layer w0.254: R7.2@45.881,93.94 R7.2@45.902,93.919
  Bottom Layer w0.8: +24.1@43.307,95.631 43.46,95.478 43.46,94.388 43.929,93.919 R7.2@45.902,93.919
+5: +5.1 C3.1 C6.1 C14.1 FB1.1 J2.1 L1.1 U2.1 U3.4 U3.5 U6.1 U6.2 | length 36.2
  Top Layer w0.2: U2.1@47.92,115.953 47.92,114.66 48.25,114.33 ; 56.35,115.45 U6.1@57.68,115.45 ; U6.2@57.68,114.84 U6.1@57.68,115.45 ; U6.1@57.68,115.49 U6.1@57.68,115.45
  Top Layer w0.5: +5.1@29.17,101.87 +5.1@29.28,101.98 ; L1.1@29.33,98.62 29.28,98.67 +5.1@29.28,101.98 ; +5.1@29.34,102.04 +5.1@29.28,101.98 ; U3.4@34.945,98.006 U3.5@33.045,98.006 33.056,98.017 33.056,100.049 C6.1@33.068,100.06 33.068,101.897 32.775,102.19 29.34,102.19 +5.1@29.28,102.13 +5.1@29.28,101.98 ; FB1.1@50.879,110.041 50.958,110.12 52.92,110.12 53.28,110.48 53.28,110.75 ; C14.1@55.048,115.25 53.95,115.25 53.28,114.58 53.28,110.75 ; v8(55.44,109.69) 55.248,109.69 54.188,110.75 53.28,110.75
  Top Layer w0.8: 48.25,114.33 49.768,114.33 C3.1@49.848,114.25 49.848,111.073 FB1.1@50.879,110.041 ; C14.1@55.048,115.25 55.248,115.45 56.35,115.45
+5_RASP: J4.02 SW1.3 | length 7.6
  Top Layer w0.8: SW1.3@34.19,120.6 34.19,123.761 34.659,124.23 38.19,124.23 J4.02@38.33,124.09
+5EF: +5EF.1 C2.1 R1.2 U1.3 U1.6 U2.6 | length 14.8
  Top Layer w0.2: U1.3@38.45,114.98 38.4,114.93 38.4,114.45 38.82,114.03 40.25,114.03 ; C2.1@42.735,116.125 42.82,116.04 42.93,115.93 R1.2@44.79,115.93 ; 44.785,114.93 44.785,115.925 R1.2@44.79,115.93 ; U2.6@45.82,115.953 45.808,115.942 44.802,115.942 R1.2@44.79,115.93
  Top Layer w0.254: U1.6@40.37,116.28 40.39,116.26 41.61,116.26
  Top Layer w0.5: C2.1@42.67,116.28 C2.1@42.78,116.17
  Top Layer w0.8: 40.25,114.03 40.26,114.02 42.34,114.02 42.82,114.5 42.82,116.04 42.82,116.13 C2.1@42.78,116.17 ; 41.61,116.26 42.65,116.26 C2.1@42.67,116.28 ; +5EF.1@44.77,113.84 44.785,113.855 44.785,114.93
+5IN: +5IN.1 C1.1 SW1.1 U1.1 | length 18.8
  Top Layer w0.2: 38.38,116.94 38.38,116.35 U1.1@38.45,116.28
  Top Layer w0.6: C1.1@38.458,118.27 C1.1@38.55,118.178
  Top Layer w0.8: +5IN.1@34.37,104.52 34.33,104.56 34.33,108.39 SW1.1@34.29,108.43 34.41,108.55 34.41,116.51 36.05,118.15 37.948,118.15 38.118,118.32 38.38,118.058 38.38,116.94
+INA: C26.2 R26.2 U9.3 VHp.1 | length 26.2
  Top Layer w0.254: R26.2@50.68,95.64 50.7,95.66 51.42,95.66 52.04,95.04 55.401,95.04 55.55,95.189 55.55,96.39 58.03,98.87 58.03,101.591 57.881,101.74 56.513,101.74 U9.3@56.496,101.757
  Top Layer w0.3: C26.2@50.673,93.392 50.673,95.633 R26.2@50.68,95.64
  Bottom Layer w0.3: VHp.1@45.8,85.69 45.8,88.303 50.673,93.176 C26.2@50.673,93.392
+INB: IN2+.1 R28.1 R33.1 U9.5 | length 24.5
  Top Layer w0.254: IN2+.1@55.69,87.73 55.59,87.83 54.61,87.83 54.25,88.19 54.25,90.79 54.59,91.13 56.01,91.13 R33.1@56.08,91.2 ; R33.1@56.16,91.28 56.11,91.33 56.11,95.94 U9.5@60.484,100.314 ; R28.1@59.31,106.09 59.31,101.13 60.04,100.4 60.664,100.4 60.751,100.487 U9.5@61.436,100.487
-5V_ANA: -5.1 C12.2 C13.1 C27.1 FB3.2 U9.4 U10.4 | length 14.3
  Top Layer w0.4: v3@53.72,100.41 v3@53.759,100.449 ; v3(61.708,96.94) 62.923,96.94 U10.4@62.937,96.954
  Top Layer w0.5: FB3.2@40.811,98.91 FB3.2@40.951,99.05 ; FB3.2@41.001,98.91 41.091,99 44.18,99 44.2,98.98 46.656,98.98 C13.1@46.69,98.946 ; C12.2@44.22,98.55 C12.2@44.3,98.63 ; C13.1@46.58,98.936 46.63,98.886 46.63,96.43 -5.1@46.68,96.38 ; v3(53.958,100.53) 53.98,100.508 56.475,100.508 U9.4@56.496,100.487 56.37,100.487 56.32,100.437 C27.1@56.32,98.83
A0: A0.1 C29.2 R9.2 SJ5.2 U10.1 U10.2 | length 24.5
  Top Layer w0.254: C29.2@60.164,96.756 60.2,96.792 60.2,97.57 61.13,98.5 65.09,98.5 65.421,98.169 65.421,97.01 U10.2@65.477,96.954 U10.1@66.747,96.954 U10.1@66.75,96.951 ; R9.2@68.04,99.68 68.05,99.67 68.05,97.099 67.901,96.95 66.751,96.95 U10.1@66.75,96.951 ; A0.1@69.62,93.67 69.362,93.928 67.822,93.928 66.75,95 U10.1@66.75,96.951
  Bottom Layer w0.254: SJ5.2@63.957,94.607 68.319,94.607 69.256,93.67 A0.1@69.62,93.67
AVDD: AVDD.1 C23.2 D3.2 FB4.2 Pot1.3 U7.13 | length 41.3
  Top Layer w0.125: 76.78,105.91 76.98,105.71 76.98,104.352 U7.13@76.959,104.331
  Top Layer w0.4: D3.2@69.73,105.42 70.936,105.42 ; AVDD.1@71.14,114.61 71.14,112.288 C23.2@71.12,112.268 71.157,112.231 FB4.2@71.157,108.458 71.17,108.445 71.17,105.654 70.936,105.42 ; 76.78,105.91 76.669,106.021 75.243,106.021 v2(75.204,106.059) 75.15,106.059 74.511,105.42 70.936,105.42
  Bottom Layer w0.254: Pot1.3@66.77,86.59 75.204,95.024 v2(75.204,106.059)
CMD: CMD.1 R15.1 R16.1 SJ6.1 SJ7.1 | length 24.3
  Top Layer w0.4: SJ6.1@50.873,83.017 51.296,83.44 CMD.1@53.36,83.44 53.475,83.555 53.475,85.725 53.85,86.1 57.31,86.1 58.825,84.585 R15.1@58.825,81.18 ; SJ7.1@58.517,79.007 SJ7.1@58.645,79.135 ; SJ7.1@58.517,79.413 58.517,79.427 58.5,79.444 58.85,79.794 58.85,81.155 R15.1@58.825,81.18 ; SJ7.1@58.645,79.295 SJ7.1@58.645,79.135 ; R15.1@58.8,81.18 R15.1@58.825,81.18 ; R16.1@64.227,81.33 R16.1@64.217,81.32 64.23,81.307 64.23,79.67 63.695,79.135 SJ7.1@58.645,79.135
GND: C1.2 C2.2 C3.2 C4.2 C5.2 C6.2 C8.2 C9.2 C11.1 C12.1 C13.2 C14.2 C15.2 C16.2 C17.2 C18.2 C19.2 C20.2 C21.2 C22.2 C23.1 C24.2 C25.2 C27.2 C28.2 C30.2 C31.1 D2.2 D3.1 D5.2 G.1 J1.2 J1.A2 J2.2 J3.5 J4.09 J4.14 J4.20 J4.25 J4.30 J4.34 J4.39 Pot1.1 Q1.1 R3.2 R4.1 R5.1 R11.2 R17.1 R21.1 R23.2 R25.1 R26.1 R27.2 R30.2 SW2.3 SW2.4 U1.2 U1.5 U2.4 U2.7 U3.2 U4.3 U4.6 U6.3 U6.4 U6.7 U7.12 U7.18 U7.31 U7.47 U7.63 U8.4 | length 20
  Top Layer w0.125: U2.4@45.82,117.253 46.382,117.253 46.87,116.766 U2.7@46.87,116.603 ; v2(82.094,100.989) 82.185,101.08 83.07,101.08 83.844,101.854 84.864,101.854 U7.63@84.9,101.89 U7.63@84.111,101.89 ; 94.57,104.034 94.574,104.03 95.64,104.03 95.924,103.746 95.924,98.073 96.266,97.731 96.266,97.282 J3.5@96.393,97.155
  Top Layer w0.254: v6(46.84,117.29) 46.86,117.27 46.86,115.94 v6(46.88,115.92) ; C3.2@51.328,113.782 C3.2@51.405,113.86 ; v5(58.472,115.288) 58.472,115.068 U6.7@58.7,114.84 ; v5(58.479,114.79) 58.65,114.79 U6.7@58.7,114.84 ; v5(58.921,114.79) 58.871,114.84 U6.7@58.7,114.84 ; v5(58.93,115.278) 58.7,115.048 U6.7@58.7,114.84 ; G.1@92.776,88.25 92.746,88.28 G.1@93,88.28 95.967,88.28 C18.2@96.012,88.235
  other v1: 32,72 36,72 40,72 44,72 48,72 52,72 56,72 60,72 64,72 68,72 72,72 76,72 80,72 84,72 88,72 96,72 30,76 34,76 38,76 42,76 50,76 54,76 78,76 82,76 86,76 94,76 98,76 44,80 60,80 68,80 72,80 80,80 84,80 88,80 92,80 96,80 30,84 34,84 38,84 42,84 46,84 58,84 62,84 66,84 70,84 74,84 78,84 82,84 86,84 90,84 94,84 98,84 28,88 36,88 44,88 52,88 60,88 76,88 80,88 88,88 70,92 86,92 32,96 48,96 68,96 80,96 78,100 82,100 94,100 98,100 28,104 32,104 36,104 48,104 84,104 38,108 62,108 66,108 74,108 94,108 28,112 32,112 36,112 44,112 48,112 52,112 56,112 64,112 76,112 80,112 84,112 88,112 96,112 30,116 62,116 66,116 70,116 74,116 78,116 82,116 90,116 94,116 98,116 40,120 44,120 52,120 56,120 60,120 76,120 80,120 84,120 88,120 92,120 96,120 30,124 90,124 94,124 98,124
  other v2: 59.664,74.699 60.424,89.429 57.264,94.449 69.164,97.819 64.194,100.209 90.064,100.359 86.294,104.589
  other v4: 57.45,114 58.24,114.03 59.02,114.04 59.84,114.05 57.45,116.24 58.22,116.26 58.94,116.25 59.66,116.27
  other v6: 46.86,116.6
  other v7: 55.72,84.24
NetC7_1: C7.1 D1.1 FB2.1 R6.2 | length 8.9
  Top Layer w0.254: D1.1@30.599,92.346 30.685,92.26 34.007,92.26 ; FB2.1@32.849,88.94 32.77,89.019 32.77,90.32 34.007,91.557 34.007,92.26 ; R6.2@34.93,92.91 34.921,92.902 34.016,92.902 C7.1@34.007,92.893 34.007,92.26
NetC7_2: C7.2 R5.2 R6.1 U3.3 | length 4.4
  Top Layer w0.245: C7.2@34.007,93.673 34.046,93.712 34.892,93.712 R6.1@34.93,93.75 34.937,93.757 34.937,95.449 U3.3@34.945,95.456 36.496,95.456 R5.2@36.65,95.61
NetC10_1: C10.1 U4.2 | length 3.3
  Top Layer w0.4: C10.1@41.23,112.36 41.27,112.32 41.27,110.692 41.71,110.252 U4.2@41.71,109.262
NetC10_2: C10.2 U4.4 | length 3.2
  Top Layer w0.4: U4.4@39.17,109.262 39.17,112.152 C10.2@39.378,112.36
NetC11_2: C11.2 FB3.1 U4.5 | length 5.6
  Top Layer w0.4: 39.16,102.82 39.16,104.42 U4.5@39.17,104.43
  Top Layer w0.5: FB3.1@39.139,98.921 FB3.1@39.15,98.91 39.159,98.919 39.159,101.701 C11.2@39.168,101.71
  Top Layer w0.6: U4.5@39.199,104.449 U4.5@39.2,104.45
  Top Layer w0.8: 39.16,102.82 39.16,101.718 C11.2@39.168,101.71
NetC29_1: C29.1 R31.2 R32.1 | length 3.3
  Top Layer w0.254: R31.2@58.581,95.239 R31.2@58.6,95.22 58.607,95.213 60.157,95.213 C29.1@60.164,95.206 60.164,93.599 R32.1@60.231,93.532
NetC30_1: C30.1 R32.2 U10.3 | length 9.5
  Top Layer w0.254: C30.1@58.524,92.156 C30.1@58.565,92.197 ; C30.1@58.644,92.106 58.657,92.119 60.398,92.119 R32.2@60.411,92.132 ; R32.2@60.379,92.1 61.111,92.1 61.26,92.249 61.26,93.91 62.48,95.13 63.86,95.13 64.21,95.48 64.21,96.951 U10.3@64.207,96.954
NetD1_2: D1.2 L1.2 U3.1 | length 6
  Top Layer w0.6: L1.2@29.33,96.25 29.19,96.25 29,96.06 29,94.998 29.351,94.646 D1.2@30.599,94.646 32.31,94.646 33.045,95.381 U3.1@33.045,95.456
NetD2_1: D2.1 J1.1 J1.A1 SJ1.2 | length 20.2
  Top Layer w0.8: J1.A1@28.89,80.11 J1.1@33.89,80.11 ; J1.1@33.61,79.99 34.77,79.99 J1.1@34.78,80 ; J1.1@33.61,80 J1.1@34.78,80 ; 37.59,80 J1.1@34.78,80 ; D2.1@39.36,76.25 39.31,76.25 39.31,80.05 ; 40.21,81.07 40.187,81.047 40.187,80.519 39.718,80.05 39.31,80.05 ; J1.1@34.78,80 34.83,80.05 39.31,80.05
NetD3_3: D3.3 R9.1 R10.1 | length 4.3
  Top Layer w0.254: D3.3@67.53,104.47 67.57,104.43 67.57,103.49 68.15,102.91 68.15,101.66 68.06,101.57 R9.1@68.06,100.45
NetD4_1: D4.1 R18.1 | length 4
  Top Layer w0.4: R18.1@76.22,80.29 76.22,76.55 D4.1@76.42,76.35
NetD4_2: D4.2 Q1.2 | length 4.9
  Top Layer w0.4: Q1.2@69.245,76.31 Q1.2@69.285,76.27 69.325,76.31 73.84,76.31 D4.2@73.88,76.35 ; D4.2@73.884,76.434 D4.2@74.03,76.58
NetD5_1: D5.1 R19.1 | length 5.8
  Top Layer w0.254: R19.1@91.694,111.917 91.719,111.942 D5.1@91.719,117.721
NetJ3_2: J3.2 R12.1 | length 8.8
  Top Layer w0.125: R12.1@89.149,93.389 R12.1@89.12,93.36 89.17,93.36 90.727,91.803 93.857,91.803 94.76,92.706 94.76,94.156 95.123,94.519 J3.2@95.123,94.615
NetJ3_4: J3.4 R13.1 | length 6.6
  Top Layer w0.125: R13.1@89.01,95.04 R13.1@89.102,94.948 ; R13.1@89.11,94.86 89.228,94.978 94.216,94.978 J3.4@95.123,95.885
NetJ4_08: J4.08 SJ3.2 | length 15.8
  Bottom Layer w0.254: J4.08@45.95,124.09 45.95,123.712 46.084,123.846 46.539,123.846 46.673,123.712 47.195,123.712 47.344,123.861 47.344,124.565 48.015,125.236 48.965,125.236 49.884,124.317 49.884,123.615 50.803,122.696 51.505,122.696 52.424,121.777 52.424,121.075 54.559,118.94 56.548,118.94 SJ3.2@56.81,118.94
NetJ4_10: J4.10 SJ4.2 | length 8.8
  Bottom Layer w0.254: J4.10@48.49,124.09 48.49,123.745 49.884,122.351 49.884,121.075 53.446,117.513 SJ4.2@53.663,117.513
NetPot1_2: Pot1.2 U10.5 | length 6
  Top Layer w0.254: U10.5@62.937,92.014 62.937,89.793 64.24,88.49 64.24,86.6 Pot1.2@64.23,86.59
NetQ1_3: Q1.3 R16.2 R17.2 Vb(Q1).1 | length 15.1
  Top Layer w0.254: R16.2@65.77,81.32 69.22,81.32 R17.2@69.27,81.37 69.285,81.355 Q1.3@69.285,78.56 69.205,78.64 67.11,78.64 66.281,77.811 66.281,72.641 66.16,72.52
NetR4_2: R4.2 U2.3 | length 2.3
  Top Layer w0.125: U2.3@47.92,117.253 47.957,117.29 47.957,119.557 R4.2@47.96,119.56
NetR8_2: R8.2 SET.1 U5.2 | length 12
  Bottom Layer w0.8: R8.2@41.243,93.039 41.217,93.065 39.523,93.065 U5.2@39.497,93.091 39.382,92.976 38.349,92.976 37.88,92.508 37.88,89.95 40.617,87.213 42.337,87.213 SET.1@42.49,87.06
NetR11_1: R11.1 U7.60 | length 2.2
  Top Layer w0.125: U7.60@84.9,100.39 86.07,100.39
  Top Layer w0.245: 86.07,100.39 R11.1@87.04,100.39 R11.1@87.09,100.34
NetR20_2: R20.2 SJ2.1 | length 7.4
  Top Layer w0.254: R20.2@46.66,80.64 46.66,81.76 49.07,84.17 50.34,84.17 50.823,84.653 50.823,84.893 50.763,84.953 50.763,85.043 SJ2.1@50.883,85.163 ; SJ2.1@50.477,85.163 SJ2.1@50.71,84.929
NetR27_1: R27.1 RV1.3 U9.2 | length 14.5
  Top Layer w0.254: R27.1@54.62,95.913 54.505,96.028 53.262,96.028 50.79,98.5 50.79,99.12 RV1.3@50.66,99.25 50.81,99.4 51.8,99.4 52.09,99.69 52.09,102.1 53.017,103.027 U9.2@56.496,103.027
NetR29_1: R29.1 R31.1 SJ5.1 U9.7 | length 26.2
  Top Layer w0.254: v2(57.28,95.8) 57.323,95.843 57.323,96.213 57.63,96.52 57.81,96.7 58.57,96.7 R31.1@58.6,96.67 ; R31.1@58.581,96.742 58.644,96.805 58.644,97.756 59.948,99.06 66.22,99.06 66.63,99.47 66.63,102.23 65.53,103.33 63.59,103.33 R29.1@63.57,103.31 63.287,103.027 U9.7@61.436,103.027
  Bottom Layer w0.254: v2(57.28,95.8) 57.346,95.734 59.036,95.734 60.15,94.62 62.83,94.62
NetR29_2: R29.2 R30.1 U9.6 | length 4.2
  Top Layer w0.254: U9.6@61.605,101.588 U9.6@61.436,101.757 63.567,101.757 R29.2@63.57,101.76 65.27,101.76 R30.1@65.35,101.68
NetR33_2: R33.2 U10.6 U10.7 | length 13.5
  Top Layer w0.254: R33.2@56.08,89.65 56.26,89.83 58.05,89.83 58.84,90.62 61.29,90.62 61.87,91.2 61.87,92.99 62.47,93.59 63.97,93.59 64.18,93.38 64.18,92.041 U10.6@64.207,92.014 U10.7@65.477,92.014
NetSJ6_2: SJ6.2 U8.1 | length 2.8
  Top Layer w0.254: SJ6.2@50.492,82.103 50.64,81.955 50.64,79.919 50.753,79.806 U8.1@50.888,79.806 ; SJ6.2@50.67,81.968 SJ6.2@50.67,82.23
NetSJ7_2: SJ7.2 U8.7 | length 2
  Top Layer w0.254: U8.7@55.637,79.155 55.643,79.161 57.474,79.161 SJ7.2@57.603,79.032
NRST: C24.1 J3.3 NRST.1 R14.2 SW2.1 SW2.2 U7.7 | length 47.1
  Top Layer w0.125: SW2.2@76.354,110.523 SW2.2@76.514,110.683 ; U7.7@79.959,104.331 79.96,104.332 79.96,105.55 ; J3.3@96.393,95.885 97.3,94.978 98.937,94.978 99.84,95.881 99.84,100.94
  Top Layer w0.245: SW2.2@76.514,110.683 80.01,110.683 ; C24.1@78.2,107.01 78.34,106.87 R14.2@80.07,106.87 ; 79.96,105.55 79.96,106.76 R14.2@80.07,106.87 ; 99.84,100.94 97.536,103.244 NRST.1@97.536,103.378 97.414,103.378 95.182,105.61 87.61,105.61 85.871,107.349 85.871,110.426 SW2.1@85.614,110.683 80.01,110.683 ; 80.01,110.683 80.01,106.93 R14.2@80.07,106.87
OUTA: OUT_G.1 R28.2 RV1.1 RV1.2 U9.1 | length 16.2
  Top Layer w0.254: RV1.2@50.66,101.79 RV1.1@50.66,104.33 50.693,104.297 U9.1@56.443,104.297 ; OUT_G.1@54.253,105.883 OUT_G.1@54.38,106.01 ; U9.1@56.496,104.297 U9.1@56.443,104.297 ; R28.2@57.76,106.09 56.61,106.09 56.27,105.75 56.27,104.47 U9.1@56.443,104.297
  Bottom Layer w0.254: RV1.1@50.66,104.33 52.36,106.03 54.36,106.03 OUT_G.1@54.38,106.01
OVLO: R2.1 R3.1 U2.2 | length 3.8
  Top Layer w0.125: U2.2@47.92,116.603 49.327,116.603 R3.1@49.36,116.57
  Top Layer w0.254: R2.1@48.72,118.25 48.73,118.24 49.291,118.24 49.44,118.091 49.44,116.65 R3.1@49.36,116.57
PA4: C17.1 R10.2 U7.20 | length 5.3
  Top Layer w0.175: 70.6,101.64 70.75,101.64 71.44,100.95 71.498,100.892 73.515,100.892 U7.20@73.518,100.89
  Top Layer w0.245: R10.2@69.67,101.58 69.68,101.57 C17.1@69.68,100.44
  Top Layer w0.3: R10.2@69.67,101.58 69.73,101.64 70.6,101.64
SWCLK: R13.2 U7.49 | length 2.5
  Top Layer w0.125: U7.49@84.9,94.89 87.38,94.89 R13.2@87.41,94.86
SWDIO: R12.2 U7.46 | length 7
  Top Layer w0.125: U7.46@81.959,92.949 81.986,92.976 81.986,94.006 82.198,94.218 85.022,94.218 85.98,93.26 87.32,93.26 R12.2@87.42,93.36
UART1_RX: RX1.1 SJ3.1 U7.25 | length 32.6
  Top Layer w0.125: 72.21,98.21 72.363,98.363 73.49,98.363 U7.25@73.518,98.39